# Altium PCB PCB1.PcbDoc (part 4 of 8)
Units mil, origin at the board's own origin, x right, y up, seen from the top; angles counter-clockwise.
Board outline 1968.5 x 1968.5 mil, 4 copper layers (Top Layer, Layer 1, Layer 2, Bottom Layer), stack 23.756 mil thick; 223 components, 143 nets, 652 pads, 329 vias.
Unrouted connection lines stored in the file: 15.
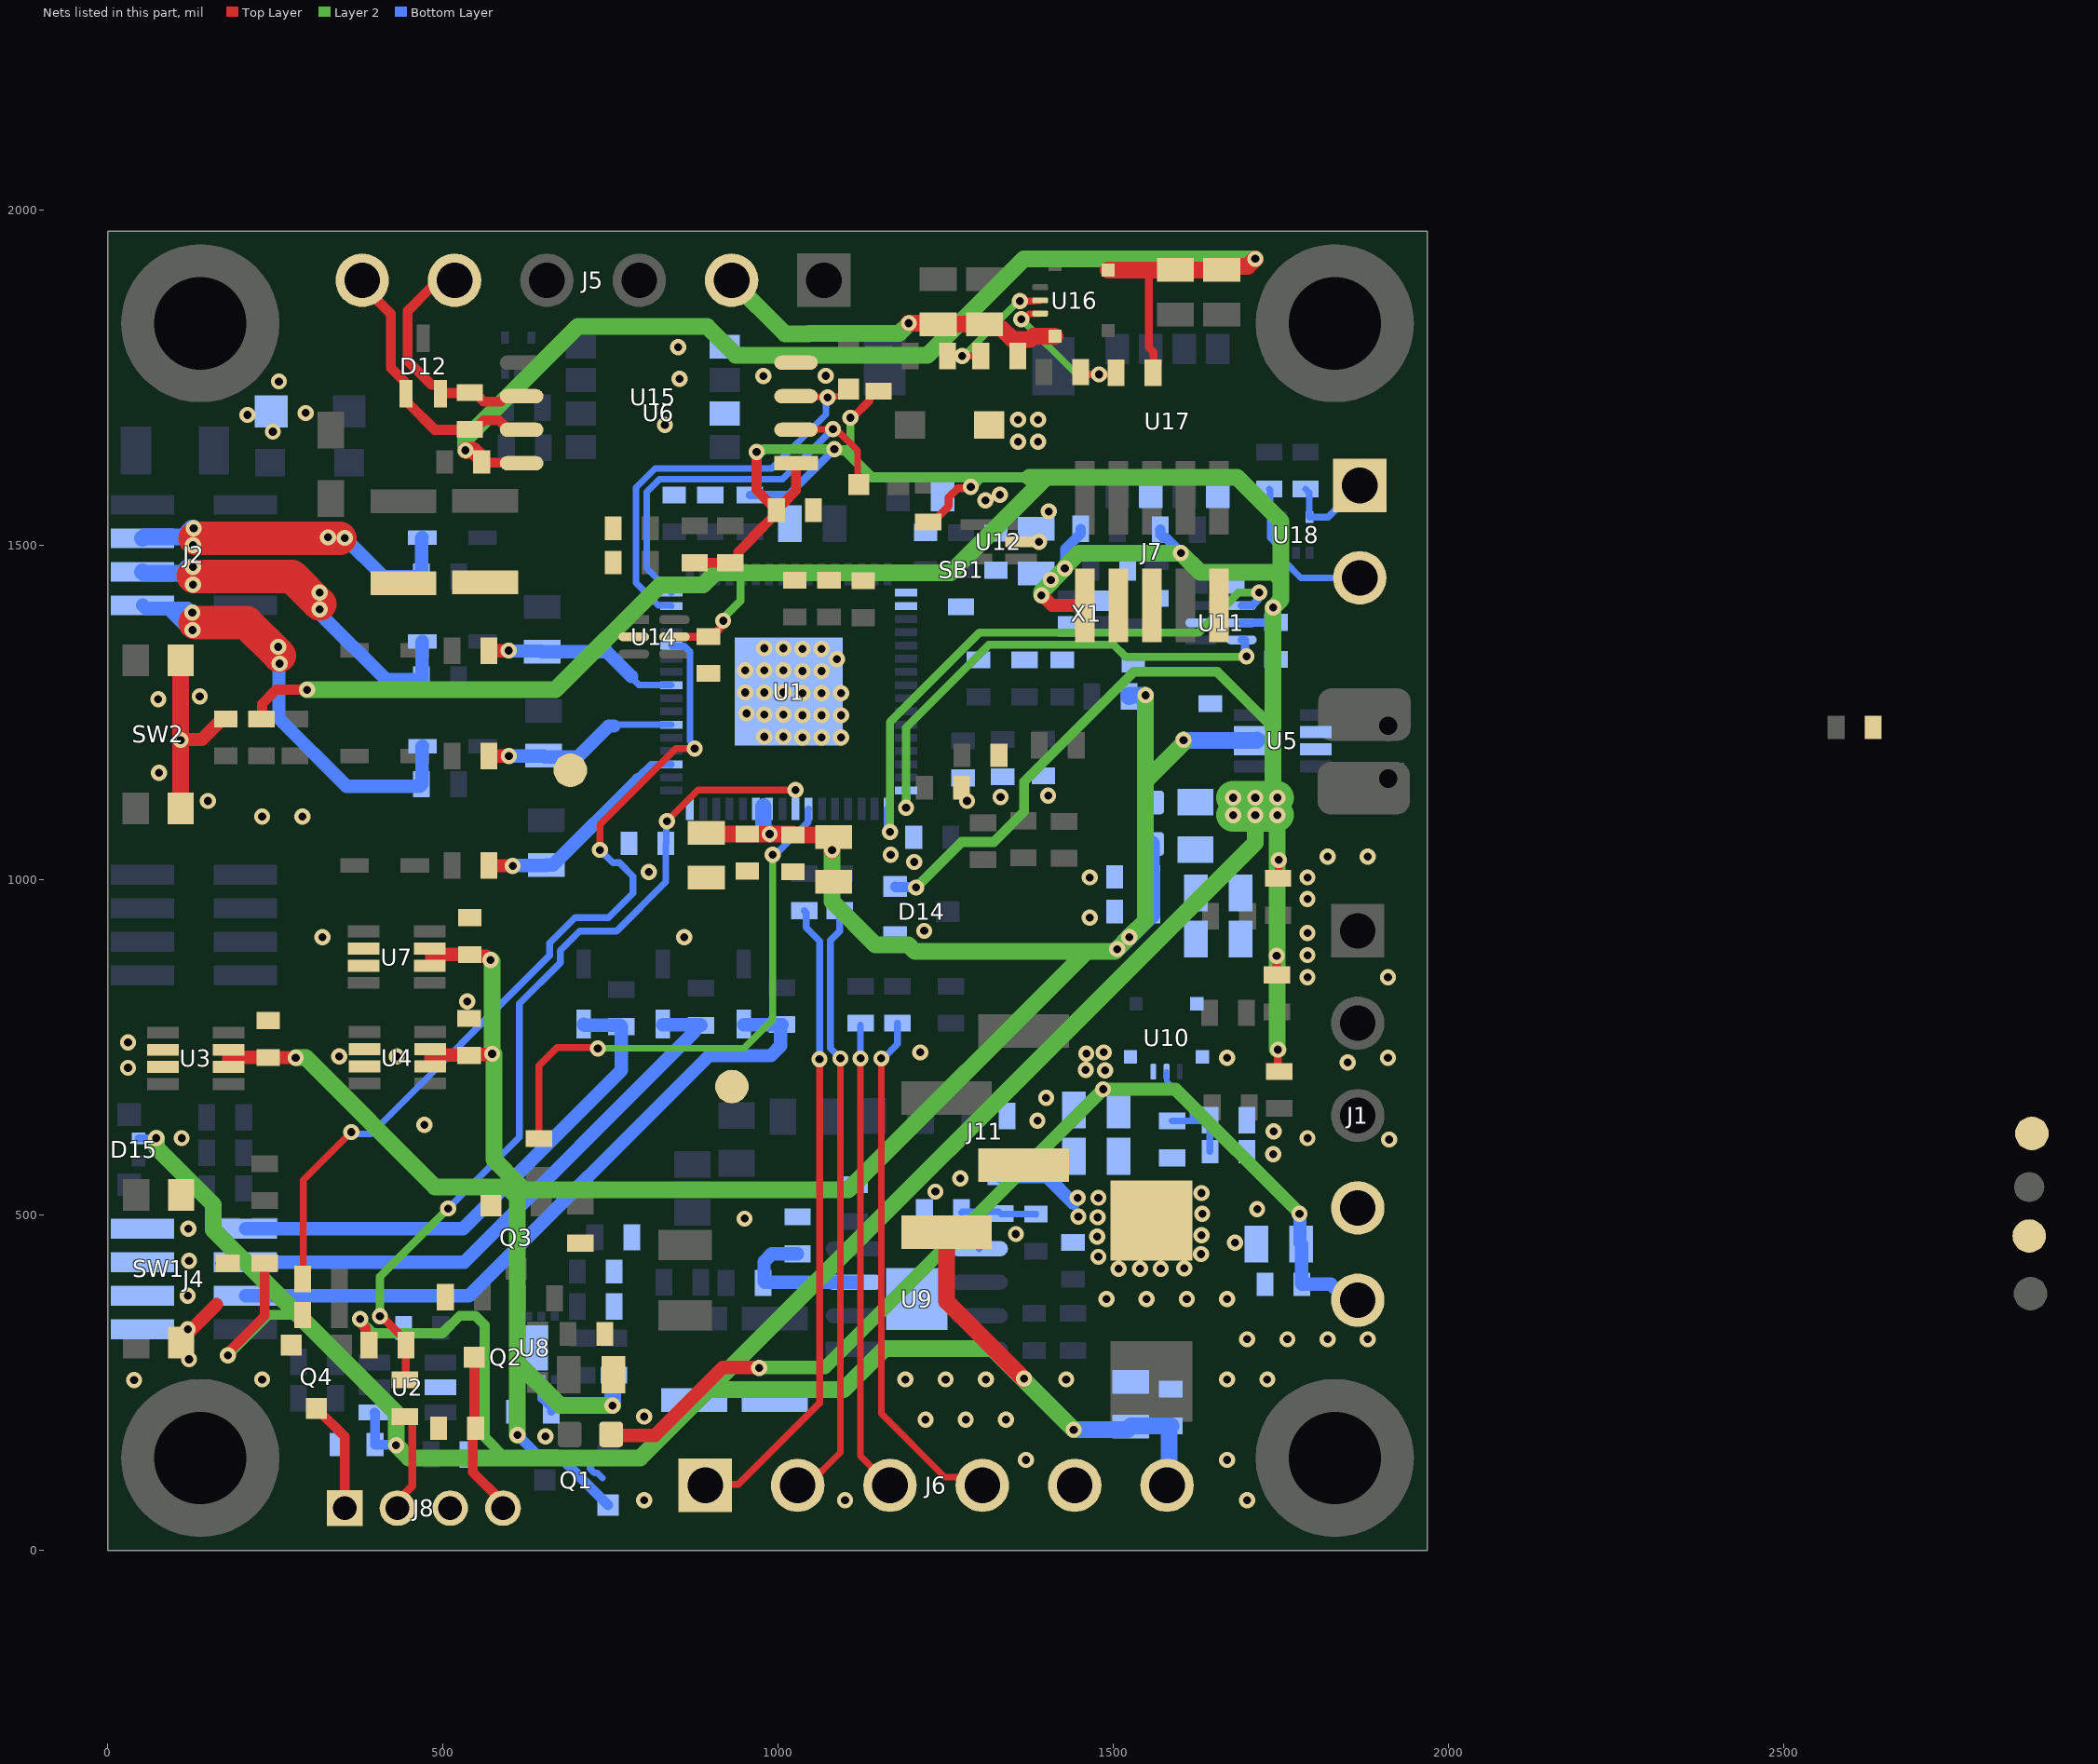
[diagram p4: the nets of this part, all layers, seen from the top]

## Part data (continued)
R21 R24: library part RS73F1JTTD2001B, "Res Thick Film 0603 2K Ohm 0.1% 0.2W(1/5W) ±25ppm/C Pad SMD T/R Automotive AEC-Q200", Arrow Part Number=SR0603FR-7T10KL, Case/Package=0603, Manufacturer="Yageo Group", Max Operating Temperature=155°C, Max Voltage Rating (DC)=100V, Min Operating Temperature=-55°C, Mouser Part Number=603-SR0603FR-7T10KL, Power Rating=250mW, Ratings=AEC-Q200, Supplier Part Number=YAG5823CT-ND, Temperature Coefficient=100ppm/°C, Tolerance=1%, Voltage Rating=75V, Working Voltage=150V, Arrow Price/Stock=https://www.arrow.com/en/products/sr0603fr-7t10kl/yageo, Category="Chip SMD Resistors", China RoHS=Non-Compliant, ComponentLink1Description=https://datasheet.octopart.com:443/SR0603FR-7T10KL-Yageo-datasheet-176402240.pdf?src-supplier=Farnell, ComponentLink1URL=https://datasheet.octopart.com:443/SR0603FR-7T10KL-Yageo-datasheet-176402240.pdf?src-supplier=Farnell, ComponentLink2Description=https://datasheet.octopart.com:443/SR0603FR-7T10KL-Yageo-datasheet-119732217.pdf?src-supplier=Upverter, ComponentLink2URL=https://datasheet.octopart.com:443/SR0603FR-7T10KL-Yageo-datasheet-119732217.pdf?src-supplier=Upverter, ComponentLink3Description=https://datasheet.octopart.com:443/SR0603FR-7T10KL-Yageo-Group-datasheet-184785656.pdf?src-supplier=Future+Electronics, ComponentLink3URL=https://datasheet.octopart.com:443/SR0603FR-7T10KL-Yageo-Group-datasheet-184785656.pdf?src-supplier=Future+Electronics, ComponentLink4Description=https://datasheet.octopart.com:443/SR0603FR-7T10KL-Yageo-datasheet-155675517.pdf?src-supplier=Future+Electronics, ComponentLink4URL=https://datasheet.octopart.com:443/SR0603FR-7T10KL-Yageo-datasheet-155675517.pdf?src-supplier=Future+Electronics, ComponentLink5Description=https://datasheet.octopart.com:443/SR0603FR-7T10KL-Yageo-datasheet-137701088.pdf?src-supplier=Future+Electronics, ComponentLink5URL=https://datasheet.octopart.com:443/SR0603FR-7T10KL-Yageo-datasheet-137701088.pdf?src-supplier=Future+Electronics, ComponentLink6Description=https://datasheet.octopart.com/SR0603FR-7T10KL-Yageo-datasheet-11047080.pdf, ComponentLink6URL=https://datasheet.octopart.com/SR0603FR-7T10KL-Yageo-datasheet-11047080.pdf, ComponentLink7Description=http://sigma.octopart.com:80/conflict_mineral_statement/Yageo-company-3.pdf?src-supplier=Compliance+Statements, ComponentLink7URL=http://sigma.octopart.com:80/conflict_mineral_statement/Yageo-company-3.pdf?src-supplier=Compliance+Statements, ComponentLink8Description=http://sigma.octopart.com:80/rohs_statement/Yageo-company-2.pdf?src-supplier=Compliance+Statements, ComponentLink8URL=http://sigma.octopart.com:80/rohs_statement/Yageo-company-2.pdf?src-supplier=Compliance+Statements, ComponentLink9Description=https://datasheet.octopart.com:443/SR0603FR-7T4R7L-Yageo-datasheet-176402240.pdf?src-supplier=Farnell, ComponentLink9URL=https://datasheet.octopart.com:443/SR0603FR-7T4R7L-Yageo-datasheet-176402240.pdf?src-supplier=Farnell, ComponentLink10Description=https://datasheet.octopart.com:443/SR0603FR-7T4R7L-Yageo-datasheet-119732217.pdf?src-supplier=Upverter, ComponentLink10URL=https://datasheet.octopart.com:443/SR0603FR-7T4R7L-Yageo-datasheet-119732217.pdf?src-supplier=Upverter, ComponentLink11Description=https://datasheet.octopart.com:443/SR0603FR-7T4R7L-Yageo-Group-datasheet-184785656.pdf?src-supplier=Future+Electronics, ComponentLink11URL=https://datasheet.octopart.com:443/SR0603FR-7T4R7L-Yageo-Group-datasheet-184785656.pdf?src-supplier=Future+Electronics, ComponentLink12Description=https://datasheet.octopart.com:443/SR0603FR-7T4R7L-Yageo-datasheet-155675517.pdf?src-supplier=Future+Electronics, ComponentLink12URL=https://datasheet.octopart.com:443/SR0603FR-7T4R7L-Yageo-datasheet-155675517.pdf?src-supplier=Future+Electronics, ComponentLink13Description=https://datasheet.octopart.com:443/SR0603FR-7T4R7L-Yageo-datasheet-137701088.pdf?src-supplier=Future+Electronics, ComponentLink13URL=https://datasheet.octopart.com:443/SR0603FR-7T4R7L-Yageo-datasheet-137701088.pdf?src-supplier=Future+Electronics, ComponentLink14Description=https://datasheet.octopart.com/SR0603FR-7T4R7L-Yageo-datasheet-11047080.pdf, ComponentLink14URL=https://datasheet.octopart.com/SR0603FR-7T4R7L-Yageo-datasheet-11047080.pdf, ComponentLink15Description=https://datasheet.octopart.com:443/SR0603FR-7T100KL-Yageo-datasheet-176402240.pdf?src-supplier=element14+APAC, ComponentLink15URL=https://datasheet.octopart.com:443/SR0603FR-7T100KL-Yageo-datasheet-176402240.pdf?src-supplier=element14+APAC, ComponentLink16Description=https://datasheet.octopart.com:443/SR0603FR-7T100KL-Yageo-datasheet-119732217.pdf?src-supplier=Upverter, ComponentLink16URL=https://datasheet.octopart.com:443/SR0603FR-7T100KL-Yageo-datasheet-119732217.pdf?src-supplier=Upverter, ComponentLink17Description=https://datasheet.octopart.com:443/SR0603FR-7T100KL-Yageo-Group-datasheet-184785656.pdf?src-supplier=Future+Electronics, ComponentLink17URL=https://datasheet.octopart.com:443/SR0603FR-7T100KL-Yageo-Group-datasheet-184785656.pdf?src-supplier=Future+Electronics, ComponentLink18Description=https://datasheet.octopart.com:443/SR0603FR-7T100KL-Yageo-datasheet-155675517.pdf?src-supplier=Future+Electronics, ComponentLink18URL=https://datasheet.octopart.com:443/SR0603FR-7T100KL-Yageo-datasheet-155675517.pdf?src-supplier=Future+Electronics, ComponentLink19Description=https://datasheet.octopart.com:443/SR0603FR-7T100KL-Yageo-datasheet-137701088.pdf?src-supplier=Future+Electronics, ComponentLink19URL=https://datasheet.octopart.com:443/SR0603FR-7T100KL-Yageo-datasheet-137701088.pdf?src-supplier=Future+Electronics, ComponentLink20Description=https://datasheet.octopart.com/SR0603FR-7T100KL-Yageo-datasheet-11047080.pdf, ComponentLink20URL=https://datasheet.octopart.com/SR0603FR-7T100KL-Yageo-datasheet-11047080.pdf, ComponentLink21Description=https://datasheet.octopart.com:443/RS73F1JTTD2001B-KOA-Speer-datasheet-182143723.pdf?src-supplier=IHS, ComponentLink21URL=https://datasheet.octopart.com:443/RS73F1JTTD2001B-KOA-Speer-datasheet-182143723.pdf?src-supplier=IHS, ComponentLink22Description=https://datasheet.octopart.com:443/RS73F1JTTD2001B-KOA-Speer-datasheet-141350738.pdf?src-supplier=KOA+Speer+SCT, ComponentLink22URL=https://datasheet.octopart.com:443/RS73F1JTTD2001B-KOA-Speer-datasheet-141350738.pdf?src-supplier=KOA+Speer+SCT, ComponentLink23Description=https://sigma.octopart.com:443/141350679/technical_drawing/KOA-Speer-RS73F1JTTD2001B.pdf?src-supplier=KOA+Speer+SCT, ComponentLink23URL=https://sigma.octopart.com:443/141350679/technical_drawing/KOA-Speer-RS73F1JTTD2001B.pdf?src-supplier=KOA+Speer+SCT, ComponentLink24Description=http://sigma.octopart.com:80/rohs_statement/KOA-Speer-company-17.pdf?src-supplier=Compliance+Statements, ComponentLink24URL=http://sigma.octopart.com:80/rohs_statement/KOA-Speer-company-17.pdf?src-supplier=Compliance+Statements, Composition="Thick Film", Country of Origin="Mainland China, Taiwan", Datasheet Link=https://mouser.componentsearchengine.com/Datasheets/1/SR0603FR-7T10KL.pdf, Export Control Classification Number (ECCN) Code=EAR99, Harmonized Tariff Schedule (HTS) Code=8533.21.00.30, Height=0.55mm, Introduction Date=2017-10-02, Length=1.6mm, Lifecycle Status=Production, Manufacturer Part Number=SR0603FR-7T10KL, Manufacturer_Name="Yageo Group", Manufacturer_Part_Number=SR0603FR-7T10KL, Mounting Technology="Surface Mount", Mouser Price/Stock=https://www.mouser.co.uk/ProductDetail/YAGEO/SR0603FR-7T10KL?qs=pfd5qewlna6IurLw3u3uRA%3D%3D, Number of Terminals=2, Packaging="Tape & Reel", Pricing="1=0,67, 10=0,399, 25=0,3376, 50=0,3022, 100=0,2744, 250=0,24612, 500=0,22976, 1000=0,21675 (USD)", REACH SVHC=Yes, RoHS=Compliant, Schedule B="8533210045, 8533210045|8533210045|8533210045|8533210045|8533210045", Stock=5000, Supplier=DigiKey, Width=800µm
R22 R31 R32: library part RK73H1JTTD1200F, "Res Thick Film 0603 120 Ohm 1% 0.125W(1/8W) ±100ppm/C Pad SMD T/R Automotive AEC-Q200", Arrow Part Number=SR0603FR-7T10KL, Case Code (Imperial)=0603, Case Code (Metric)=1608, Manufacturer="Yageo Group", Max Operating Temperature=155°C, Max Power Dissipation=125mW, Max Voltage Rating (DC)=150V, Min Operating Temperature=-55°C, Mouser Part Number=603-SR0603FR-7T10KL, Power Rating=250mW, Ratings=AEC-Q200, Supplier Part Number=YAG5823CT-ND, Temperature Coefficient=100ppm/°C, Tolerance=1%, Voltage Rating=75V, Voltage Rating (DC)=50V, Arrow Price/Stock=https://www.arrow.com/en/products/sr0603fr-7t10kl/yageo, Case/Package=0603, Category="Chip SMD Resistors", China RoHS=Non-Compliant, ComponentLink1Description=https://datasheet.octopart.com:443/SR0603FR-7T10KL-Yageo-datasheet-176402240.pdf?src-supplier=Farnell, ComponentLink1URL=https://datasheet.octopart.com:443/SR0603FR-7T10KL-Yageo-datasheet-176402240.pdf?src-supplier=Farnell, ComponentLink2Description=https://datasheet.octopart.com:443/SR0603FR-7T10KL-Yageo-datasheet-119732217.pdf?src-supplier=Upverter, ComponentLink2URL=https://datasheet.octopart.com:443/SR0603FR-7T10KL-Yageo-datasheet-119732217.pdf?src-supplier=Upverter, ComponentLink3Description=https://datasheet.octopart.com:443/SR0603FR-7T10KL-Yageo-Group-datasheet-184785656.pdf?src-supplier=Future+Electronics, ComponentLink3URL=https://datasheet.octopart.com:443/SR0603FR-7T10KL-Yageo-Group-datasheet-184785656.pdf?src-supplier=Future+Electronics, ComponentLink4Description=https://datasheet.octopart.com:443/SR0603FR-7T10KL-Yageo-datasheet-155675517.pdf?src-supplier=Future+Electronics, ComponentLink4URL=https://datasheet.octopart.com:443/SR0603FR-7T10KL-Yageo-datasheet-155675517.pdf?src-supplier=Future+Electronics, ComponentLink5Description=https://datasheet.octopart.com:443/SR0603FR-7T10KL-Yageo-datasheet-137701088.pdf?src-supplier=Future+Electronics, ComponentLink5URL=https://datasheet.octopart.com:443/SR0603FR-7T10KL-Yageo-datasheet-137701088.pdf?src-supplier=Future+Electronics, ComponentLink6Description=https://datasheet.octopart.com/SR0603FR-7T10KL-Yageo-datasheet-11047080.pdf, ComponentLink6URL=https://datasheet.octopart.com/SR0603FR-7T10KL-Yageo-datasheet-11047080.pdf, ComponentLink7Description=http://sigma.octopart.com:80/conflict_mineral_statement/Yageo-company-3.pdf?src-supplier=Compliance+Statements, ComponentLink7URL=http://sigma.octopart.com:80/conflict_mineral_statement/Yageo-company-3.pdf?src-supplier=Compliance+Statements, ComponentLink8Description=http://sigma.octopart.com:80/rohs_statement/Yageo-company-2.pdf?src-supplier=Compliance+Statements, ComponentLink8URL=http://sigma.octopart.com:80/rohs_statement/Yageo-company-2.pdf?src-supplier=Compliance+Statements, ComponentLink9Description=https://datasheet.octopart.com:443/SR0603FR-7T4R7L-Yageo-datasheet-176402240.pdf?src-supplier=Farnell, ComponentLink9URL=https://datasheet.octopart.com:443/SR0603FR-7T4R7L-Yageo-datasheet-176402240.pdf?src-supplier=Farnell, ComponentLink10Description=https://datasheet.octopart.com:443/SR0603FR-7T4R7L-Yageo-datasheet-119732217.pdf?src-supplier=Upverter, ComponentLink10URL=https://datasheet.octopart.com:443/SR0603FR-7T4R7L-Yageo-datasheet-119732217.pdf?src-supplier=Upverter, ComponentLink11Description=https://datasheet.octopart.com:443/SR0603FR-7T4R7L-Yageo-Group-datasheet-184785656.pdf?src-supplier=Future+Electronics, ComponentLink11URL=https://datasheet.octopart.com:443/SR0603FR-7T4R7L-Yageo-Group-datasheet-184785656.pdf?src-supplier=Future+Electronics, ComponentLink12Description=https://datasheet.octopart.com:443/SR0603FR-7T4R7L-Yageo-datasheet-155675517.pdf?src-supplier=Future+Electronics, ComponentLink12URL=https://datasheet.octopart.com:443/SR0603FR-7T4R7L-Yageo-datasheet-155675517.pdf?src-supplier=Future+Electronics, ComponentLink13Description=https://datasheet.octopart.com:443/SR0603FR-7T4R7L-Yageo-datasheet-137701088.pdf?src-supplier=Future+Electronics, ComponentLink13URL=https://datasheet.octopart.com:443/SR0603FR-7T4R7L-Yageo-datasheet-137701088.pdf?src-supplier=Future+Electronics, ComponentLink14Description=https://datasheet.octopart.com/SR0603FR-7T4R7L-Yageo-datasheet-11047080.pdf, ComponentLink14URL=https://datasheet.octopart.com/SR0603FR-7T4R7L-Yageo-datasheet-11047080.pdf, ComponentLink15Description=https://datasheet.octopart.com:443/SG73G1JTTD5102C-KOA-Speer-datasheet-181956059.pdf?src-supplier=IHS, ComponentLink15URL=https://datasheet.octopart.com:443/SG73G1JTTD5102C-KOA-Speer-datasheet-181956059.pdf?src-supplier=IHS, ComponentLink16Description=https://sigma.octopart.com:443/141350679/technical_drawing/KOA-Speer-SG73G1JTTD5102C.pdf?src-supplier=KOA+Speer+SCT, ComponentLink16URL=https://sigma.octopart.com:443/141350679/technical_drawing/KOA-Speer-SG73G1JTTD5102C.pdf?src-supplier=KOA+Speer+SCT, ComponentLink17Description=https://datasheet.octopart.com:443/SG73G1JTTD5102C-KOA-Speer-datasheet-141350755.pdf?src-supplier=KOA+Speer+SCT, ComponentLink17URL=https://datasheet.octopart.com:443/SG73G1JTTD5102C-KOA-Speer-datasheet-141350755.pdf?src-supplier=KOA+Speer+SCT, ComponentLink18Description=http://sigma.octopart.com:80/rohs_statement/KOA-Speer-company-17.pdf?src-supplier=Compliance+Statements, ComponentLink18URL=http://sigma.octopart.com:80/rohs_statement/KOA-Speer-company-17.pdf?src-supplier=Compliance+Statements, ComponentLink19Description=https://datasheet.octopart.com:443/ESR03EZPD5102-ROHM-datasheet-182147624.pdf?src-supplier=IHS, ComponentLink19URL=https://datasheet.octopart.com:443/ESR03EZPD5102-ROHM-datasheet-182147624.pdf?src-supplier=IHS, ComponentLink20Description=https://datasheet.octopart.com:443/RK73H1JTTD68R0F-KOA-Speer-datasheet-181956035.pdf?src-supplier=IHS, ComponentLink20URL=https://datasheet.octopart.com:443/RK73H1JTTD68R0F-KOA-Speer-datasheet-181956035.pdf?src-supplier=IHS, ComponentLink21Description=https://datasheet.octopart.com:443/RK73H1JTTD68R0F-KOA-Speer-datasheet-11590619.pdf?src-supplier=Upverter, ComponentLink21URL=https://datasheet.octopart.com:443/RK73H1JTTD68R0F-KOA-Speer-datasheet-11590619.pdf?src-supplier=Upverter, ComponentLink22Description=https://datasheet.octopart.com:443/RK73H1JTTD68R0F-KOA-Speer-datasheet-149653815.pdf?src-supplier=Newark, ComponentLink22URL=https://datasheet.octopart.com:443/RK73H1JTTD68R0F-KOA-Speer-datasheet-149653815.pdf?src-supplier=Newark, ComponentLink23Description=https://datasheet.octopart.com:443/RK73H1JTTD68R0F-KOA-Speer-datasheet-10854116.pdf?src-supplier=element14+APAC, ComponentLink23URL=https://datasheet.octopart.com:443/RK73H1JTTD68R0F-KOA-Speer-datasheet-10854116.pdf?src-supplier=element14+APAC, ComponentLink24Description=https://datasheet.octopart.com:443/RNCP0603FTD10K0-Stackpole-Electronics-datasheet-182148179.pdf?src-supplier=IHS, ComponentLink24URL=https://datasheet.octopart.com:443/RNCP0603FTD10K0-Stackpole-Electronics-datasheet-182148179.pdf?src-supplier=IHS, ComponentLink25Description=https://datasheet.octopart.com:443/RNCP0603FTD10K0-Stackpole-Electronics-datasheet-141193801.pdf?src-supplier=Upverter, ComponentLink25URL=https://datasheet.octopart.com:443/RNCP0603FTD10K0-Stackpole-Electronics-datasheet-141193801.pdf?src-supplier=Upverter, ComponentLink26Description=https://datasheet.octopart.com:443/RNCP0603FTD10K0-Stackpole-Electronics-datasheet-38896780.pdf?src-supplier=Upverter, ComponentLink26URL=https://datasheet.octopart.com:443/RNCP0603FTD10K0-Stackpole-Electronics-datasheet-38896780.pdf?src-supplier=Upverter, ComponentLink27Description=https://datasheet.octopart.com:443/RNCP0603FTD10K0-Stackpole-Electronics-datasheet-149178200.pdf?src-supplier=Upverter, ComponentLink27URL=https://datasheet.octopart.com:443/RNCP0603FTD10K0-Stackpole-Electronics-datasheet-149178200.pdf?src-supplier=Upverter, ComponentLink28Description=https://datasheet.octopart.com:443/RNCP0603FTD10K0-Stackpole-Electronics-datasheet-33021030.pdf?src-supplier=Future+Electronics, ComponentLink28URL=https://datasheet.octopart.com:443/RNCP0603FTD10K0-Stackpole-Electronics-datasheet-33021030.pdf?src-supplier=Future+Electronics, ComponentLink29Description=http://sigma.octopart.com:80/15942470/materials_sheet/Stackpole-Electronics-RNCP0603FTD10K0.pdf?src-supplier=Compliance+Statements, ComponentLink29URL=http://sigma.octopart.com:80/15942470/materials_sheet/Stackpole-Electronics-RNCP0603FTD10K0.pdf?src-supplier=Compliance+Statements, ComponentLink30Description=http://sigma.octopart.com:80/141158212/rohs_statement/Stackpole-Electronics-RNCP0603FTD10K0.pdf?src-supplier=Compliance+Statements, ComponentLink30URL=http://sigma.octopart.com:80/141158212/rohs_statement/Stackpole-Electronics-RNCP0603FTD10K0.pdf?src-supplier=Compliance+Statements, ComponentLink31Description=http://sigma.octopart.com:80/141158211/reach_statement/Stackpole-Electronics-RNCP0603FTD10K0.pdf?src-supplier=Compliance+Statements, ComponentLink31URL=http://sigma.octopart.com:80/141158211/reach_statement/Stackpole-Electronics-RNCP0603FTD10K0.pdf?src-supplier=Compliance+Statements, ComponentLink32Description=https://datasheet.octopart.com:443/RK73H1JTTD1200F-KOA-Speer-datasheet-181956035.pdf?src-supplier=IHS, ComponentLink32URL=https://datasheet.octopart.com:443/RK73H1JTTD1200F-KOA-Speer-datasheet-181956035.pdf?src-supplier=IHS, ComponentLink33Description=https://datasheet.octopart.com:443/RK73H1JTTD1200F-KOA-Speer-datasheet-11590619.pdf?src-supplier=Upverter, ComponentLink33URL=https://datasheet.octopart.com:443/RK73H1JTTD1200F-KOA-Speer-datasheet-11590619.pdf?src-supplier=Upverter, ComponentLink34Description=https://datasheet.octopart.com:443/RK73H1JTTD1200F-KOA-Speer-datasheet-149653815.pdf?src-supplier=Farnell, ComponentLink34URL=https://datasheet.octopart.com:443/RK73H1JTTD1200F-KOA-Speer-datasheet-149653815.pdf?src-supplier=Farnell, ComponentLink35Description=https://datasheet.octopart.com:443/RK73H1JTTD1200F-KOA-Speer-datasheet-188906116.pdf?src-supplier=TME, ComponentLink35URL=https://datasheet.octopart.com:443/RK73H1JTTD1200F-KOA-Speer-datasheet-188906116.pdf?src-supplier=TME, ComponentLink36Description=https://datasheet.octopart.com/RK73H-%7C-Flat-Chip-Resistors-%28Precision-Grade%29-KOA-Speer-datasheet-family-85.pdf, ComponentLink36URL=https://datasheet.octopart.com/RK73H-%7C-Flat-Chip-Resistors-%28Precision-Grade%29-KOA-Speer-datasheet-family-85.pdf, ComponentLink37Description=https://datasheet.octopart.com:443/RK73H1JTTD1200F-KOA-Speer-datasheet-10854116.pdf?src-supplier=element14+APAC, ComponentLink37URL=https://datasheet.octopart.com:443/RK73H1JTTD1200F-KOA-Speer-datasheet-10854116.pdf?src-supplier=element14+APAC, ComponentLink38Description=http://sigma.octopart.com:80/rohs_certificate/RK73H-%7C-Flat-Chip-Resistors-%28Precision-Grade%29-KOA-Speer-family-91.pdf?src-supplier=Compliance+Statements, ComponentLink38URL=http://sigma.octopart.com:80/rohs_certificate/RK73H-%7C-Flat-Chip-Resistors-%28Precision-Grade%29-KOA-Speer-family-91.pdf?src-supplier=Compliance+Statements, Composition="Thick Film", Contact Plating=Tin, Country of Origin="Mainland China, Taiwan", Datasheet Link=https://mouser.componentsearchengine.com/Datasheets/1/SR0603FR-7T10KL.pdf, Depth=800µm, Export Control Classification Number (ECCN) Code=EAR99, Features="Anti-Sulfur, Moisture Resistant", Harmonized Tariff Schedule (HTS) Code=8533.21.00.30, Height=0.55mm, Introduction Date=2017-10-02, Lead Free="Lead Free", Length=1.6mm, Lifecycle Status=Production, Manufacturer Part Number=SR0603FR-7T10KL, Manufacturer_Name="Yageo Group", Manufacturer_Part_Number=SR0603FR-7T10KL, Military Standard=Not, Mounting Technology="Surface Mount", Mouser Price/Stock=https://www.mouser.co.uk/ProductDetail/YAGEO/SR0603FR-7T10KL?qs=pfd5qewlna6IurLw3u3uRA%3D%3D, Number of Terminals=2, Number of Terminations=2, Packaging="Tape & Reel", Pins=2, Pricing="1=0,67, 10=0,399, 25=0,3376, 50=0,3022, 100=0,2744, 250=0,24612, 500=0,22976, 1000=0,21675 (USD)", Radiation Hardening=No, REACH SVHC=Yes, RoHS=Compliant, Schedule B="8533210045, 8533210045|8533210045, 8533210045|8533210045|8533210045, 8533210045|8533210045|8533210045|8533210045", Stock=5000, Supplier=DigiKey, Termination=SMD/SMT, Width=800µm, Working Voltage=150V
R28 R29 R30 R55 R56 R57 R60 R62 R63 R64 R65 R66 R67 R68 R69 R70 R78: library part AC0603FR-7W2KL, "Fixed Resistor, Metal Glaze/Thick Film, 0.2W, 2000ohm, 75V, 1% +/-Tol, Surface Mount, 0603", Arrow Part Number=SR0603FR-7T10KL, Case/Package=0603, Manufacturer="Yageo Group", Max Operating Temperature=155°C, Max Voltage Rating (DC)=100V, Min Operating Temperature=-55°C, Mouser Part Number=603-SR0603FR-7T10KL, Power Rating=250mW, Ratings=AEC-Q200, Supplier Part Number=YAG5823CT-ND, Temperature Coefficient=100ppm/°C, Tolerance=1%, Voltage Rating=75V, Working Voltage=150V, Arrow Price/Stock=https://www.arrow.com/en/products/sr0603fr-7t10kl/yageo, Category="Chip SMD Resistors", China RoHS=Non-Compliant, ClassName=gate_driver, ComponentLink1Description=https://datasheet.octopart.com:443/SR0603FR-7T10KL-Yageo-datasheet-176402240.pdf?src-supplier=Farnell, ComponentLink1URL=https://datasheet.octopart.com:443/SR0603FR-7T10KL-Yageo-datasheet-176402240.pdf?src-supplier=Farnell, ComponentLink2Description=https://datasheet.octopart.com:443/SR0603FR-7T10KL-Yageo-datasheet-119732217.pdf?src-supplier=Upverter, ComponentLink2URL=https://datasheet.octopart.com:443/SR0603FR-7T10KL-Yageo-datasheet-119732217.pdf?src-supplier=Upverter, ComponentLink3Description=https://datasheet.octopart.com:443/SR0603FR-7T10KL-Yageo-Group-datasheet-184785656.pdf?src-supplier=Future+Electronics, ComponentLink3URL=https://datasheet.octopart.com:443/SR0603FR-7T10KL-Yageo-Group-datasheet-184785656.pdf?src-supplier=Future+Electronics, ComponentLink4Description=https://datasheet.octopart.com:443/SR0603FR-7T10KL-Yageo-datasheet-155675517.pdf?src-supplier=Future+Electronics, ComponentLink4URL=https://datasheet.octopart.com:443/SR0603FR-7T10KL-Yageo-datasheet-155675517.pdf?src-supplier=Future+Electronics, ComponentLink5Description=https://datasheet.octopart.com:443/SR0603FR-7T10KL-Yageo-datasheet-137701088.pdf?src-supplier=Future+Electronics, ComponentLink5URL=https://datasheet.octopart.com:443/SR0603FR-7T10KL-Yageo-datasheet-137701088.pdf?src-supplier=Future+Electronics, ComponentLink6Description=https://datasheet.octopart.com/SR0603FR-7T10KL-Yageo-datasheet-11047080.pdf, ComponentLink6URL=https://datasheet.octopart.com/SR0603FR-7T10KL-Yageo-datasheet-11047080.pdf, ComponentLink7Description=http://sigma.octopart.com:80/conflict_mineral_statement/Yageo-company-3.pdf?src-supplier=Compliance+Statements, ComponentLink7URL=http://sigma.octopart.com:80/conflict_mineral_statement/Yageo-company-3.pdf?src-supplier=Compliance+Statements, ComponentLink8Description=http://sigma.octopart.com:80/rohs_statement/Yageo-company-2.pdf?src-supplier=Compliance+Statements, ComponentLink8URL=http://sigma.octopart.com:80/rohs_statement/Yageo-company-2.pdf?src-supplier=Compliance+Statements, ComponentLink9Description=https://datasheet.octopart.com:443/SR0603FR-7T4R7L-Yageo-datasheet-176402240.pdf?src-supplier=Farnell, ComponentLink9URL=https://datasheet.octopart.com:443/SR0603FR-7T4R7L-Yageo-datasheet-176402240.pdf?src-supplier=Farnell, ComponentLink10Description=https://datasheet.octopart.com:443/SR0603FR-7T4R7L-Yageo-datasheet-119732217.pdf?src-supplier=Upverter, ComponentLink10URL=https://datasheet.octopart.com:443/SR0603FR-7T4R7L-Yageo-datasheet-119732217.pdf?src-supplier=Upverter, ComponentLink11Description=https://datasheet.octopart.com:443/SR0603FR-7T4R7L-Yageo-Group-datasheet-184785656.pdf?src-supplier=Future+Electronics, ComponentLink11URL=https://datasheet.octopart.com:443/SR0603FR-7T4R7L-Yageo-Group-datasheet-184785656.pdf?src-supplier=Future+Electronics, ComponentLink12Description=https://datasheet.octopart.com:443/SR0603FR-7T4R7L-Yageo-datasheet-155675517.pdf?src-supplier=Future+Electronics, ComponentLink12URL=https://datasheet.octopart.com:443/SR0603FR-7T4R7L-Yageo-datasheet-155675517.pdf?src-supplier=Future+Electronics, ComponentLink13Description=https://datasheet.octopart.com:443/SR0603FR-7T4R7L-Yageo-datasheet-137701088.pdf?src-supplier=Future+Electronics, ComponentLink13URL=https://datasheet.octopart.com:443/SR0603FR-7T4R7L-Yageo-datasheet-137701088.pdf?src-supplier=Future+Electronics, ComponentLink14Description=https://datasheet.octopart.com/SR0603FR-7T4R7L-Yageo-datasheet-11047080.pdf, ComponentLink14URL=https://datasheet.octopart.com/SR0603FR-7T4R7L-Yageo-datasheet-11047080.pdf, ComponentLink15Description=https://datasheet.octopart.com:443/SR0603FR-7T100KL-Yageo-datasheet-176402240.pdf?src-supplier=element14+APAC, ComponentLink15URL=https://datasheet.octopart.com:443/SR0603FR-7T100KL-Yageo-datasheet-176402240.pdf?src-supplier=element14+APAC, ComponentLink16Description=https://datasheet.octopart.com:443/SR0603FR-7T100KL-Yageo-datasheet-119732217.pdf?src-supplier=Upverter, ComponentLink16URL=https://datasheet.octopart.com:443/SR0603FR-7T100KL-Yageo-datasheet-119732217.pdf?src-supplier=Upverter, ComponentLink17Description=https://datasheet.octopart.com:443/SR0603FR-7T100KL-Yageo-Group-datasheet-184785656.pdf?src-supplier=Future+Electronics, ComponentLink17URL=https://datasheet.octopart.com:443/SR0603FR-7T100KL-Yageo-Group-datasheet-184785656.pdf?src-supplier=Future+Electronics, ComponentLink18Description=https://datasheet.octopart.com:443/SR0603FR-7T100KL-Yageo-datasheet-155675517.pdf?src-supplier=Future+Electronics, ComponentLink18URL=https://datasheet.octopart.com:443/SR0603FR-7T100KL-Yageo-datasheet-155675517.pdf?src-supplier=Future+Electronics, ComponentLink19Description=https://datasheet.octopart.com:443/SR0603FR-7T100KL-Yageo-datasheet-137701088.pdf?src-supplier=Future+Electronics, ComponentLink19URL=https://datasheet.octopart.com:443/SR0603FR-7T100KL-Yageo-datasheet-137701088.pdf?src-supplier=Future+Electronics, ComponentLink20Description=https://datasheet.octopart.com/SR0603FR-7T100KL-Yageo-datasheet-11047080.pdf, ComponentLink20URL=https://datasheet.octopart.com/SR0603FR-7T100KL-Yageo-datasheet-11047080.pdf, ComponentLink21Description=https://datasheet.octopart.com:443/RS73F1JTTD2001B-KOA-Speer-datasheet-182143723.pdf?src-supplier=IHS, ComponentLink21URL=https://datasheet.octopart.com:443/RS73F1JTTD2001B-KOA-Speer-datasheet-182143723.pdf?src-supplier=IHS, ComponentLink22Description=https://datasheet.octopart.com:443/RS73F1JTTD2001B-KOA-Speer-datasheet-141350738.pdf?src-supplier=KOA+Speer+SCT, ComponentLink22URL=https://datasheet.octopart.com:443/RS73F1JTTD2001B-KOA-Speer-datasheet-141350738.pdf?src-supplier=KOA+Speer+SCT, ComponentLink23Description=https://sigma.octopart.com:443/141350679/technical_drawing/KOA-Speer-RS73F1JTTD2001B.pdf?src-supplier=KOA+Speer+SCT, ComponentLink23URL=https://sigma.octopart.com:443/141350679/technical_drawing/KOA-Speer-RS73F1JTTD2001B.pdf?src-supplier=KOA+Speer+SCT, ComponentLink24Description=http://sigma.octopart.com:80/rohs_statement/KOA-Speer-company-17.pdf?src-supplier=Compliance+Statements, ComponentLink24URL=http://sigma.octopart.com:80/rohs_statement/KOA-Speer-company-17.pdf?src-supplier=Compliance+Statements, ComponentLink25Description=https://datasheet.octopart.com:443/AC0603FR-7W2KL-Yageo-datasheet-182189377.pdf?src-supplier=IHS, ComponentLink25URL=https://datasheet.octopart.com:443/AC0603FR-7W2KL-Yageo-datasheet-182189377.pdf?src-supplier=IHS, ComponentLink26Description=https://datasheet.octopart.com:443/AC0603FR-7W2KL-Yageo-datasheet-86786639.pdf?src-supplier=Upverter, ComponentLink26URL=https://datasheet.octopart.com:443/AC0603FR-7W2KL-Yageo-datasheet-86786639.pdf?src-supplier=Upverter, ComponentLink27Description=https://datasheet.octopart.com/AC0603FR-7W2KL-Yageo-datasheet-12512238.pdf, ComponentLink27URL=https://datasheet.octopart.com/AC0603FR-7W2KL-Yageo-datasheet-12512238.pdf, Composition="Thick Film", Country of Origin="Mainland China, Taiwan", Datasheet Link=https://mouser.componentsearchengine.com/Datasheets/1/SR0603FR-7T10KL.pdf, Export Control Classification Number (ECCN) Code=EAR99, Harmonized Tariff Schedule (HTS) Code=8533.21.00.30, Height=0.55mm, Introduction Date=2017-10-02, Length=1.6mm, Lifecycle Status=Production, Manufacturer Part Number=SR0603FR-7T10KL, Manufacturer_Name="Yageo Group", Manufacturer_Part_Number=SR0603FR-7T10KL, Mounting Technology="Surface Mount", Mouser Price/Stock=https://www.mouser.co.uk/ProductDetail/YAGEO/SR0603FR-7T10KL?qs=pfd5qewlna6IurLw3u3uRA%3D%3D, Number of Terminals=2, Packaging="Tape & Reel", Pricing="1=0,67, 10=0,399, 25=0,3376, 50=0,3022, 100=0,2744, 250=0,24612, 500=0,22976, 1000=0,21675 (USD)", REACH SVHC=Yes, RoHS=Compliant, Schedule B="8533210045, 8533210045|8533210045|8533210045|8533210045|8533210045", Stock=5000, Supplier=DigiKey, Width=800µm
R33 R34 R58 R59 R71: library part RQ73C2A75KBTD, "Fixed Resistor, Thin Film, 0.2W, 75000ohm, 100V, 0.1% +/-Tol, 10ppm/Cel, Surface Mount, 0805", Case/Package=0805, Manufacturer=Yageo, Manufacturer Lifecycle Status=ACTIVE, Manufacturer Part Number=SR0805FR-7W4R7L, Max Operating Temperature=155°C, Min Operating Temperature=-55°C, Operating Supply Voltage=100V, Package=SR0805, Power Rating=0.25W, Ratings=AEC-Q200, Resistance=4.7Ω, Temperature="-55°C to +155°C", Temperature Coefficient=10ppm/°C, Temperature Range High=+155°C, Tolerance=0.01, Voltage Rating=150V, Automotive=Yes, Automotive Grade="Grade 0", Category=Res, China RoHS=Compliant, ComponentLink1Description=https://datasheet.octopart.com:443/RQ73C2A75KBTD-TE-Connectivity-datasheet-179163842.pdf?src-supplier=IHS, ComponentLink1URL=https://datasheet.octopart.com:443/RQ73C2A75KBTD-TE-Connectivity-datasheet-179163842.pdf?src-supplier=IHS, ComponentLink2Description=Datasheet, ComponentLink2URL=http://www.yageo.com/documents/recent/PYu-SR_D_F%20tol_RoHS_L_3.pdf, ComponentLink3Description=https://datasheet.octopart.com:443/RQ73C2A75KBTD-TE-Connectivity-datasheet-141404639.pdf?src-supplier=Upverter, ComponentLink3URL=https://datasheet.octopart.com:443/RQ73C2A75KBTD-TE-Connectivity-datasheet-141404639.pdf?src-supplier=Upverter, ComponentLink4Description=https://datasheet.octopart.com:443/RQ73C2A75KBTD-TE-Connectivity-datasheet-129104565.pdf?src-supplier=Electro+Sonic, ComponentLink4URL=https://datasheet.octopart.com:443/RQ73C2A75KBTD-TE-Connectivity-datasheet-129104565.pdf?src-supplier=Electro+Sonic, ComponentLink5Description=https://sigma.octopart.com:443/129121914/technical_drawing/TE-Connectivity-RQ73C2A75KBTD.pdf?src-supplier=TE+Connectivity, ComponentLink5URL=https://sigma.octopart.com:443/129121914/technical_drawing/TE-Connectivity-RQ73C2A75KBTD.pdf?src-supplier=TE+Connectivity, ComponentLink6Description=https://datasheet.octopart.com:443/7-2176381-6-TE-Connectivity-datasheet-181572785.pdf?src-supplier=Sager+Electronics, ComponentLink6URL=https://datasheet.octopart.com:443/7-2176381-6-TE-Connectivity-datasheet-181572785.pdf?src-supplier=Sager+Electronics, Composition="Thick Film", Device Class L1="Passive Components", Device Class L2=Resistors, Device Class L3="Chip SMD Resistors", Digikey Description="RES SMD 4.7 OHM 1% 1/4W 0805", Footprint Url=http://www.yageo.com/exep/pages/download/literatures/PYu-R_Mount_10.pdf, Height=0.6mm, Ipc Land Pattern Name=RESC200125X50, Lead Free=Yes, Length=2mm, Lifecycle Status=Production, Mounting Technology="Surface Mount", Number of Terminals=2, Octopart=https://octopart.com/sr0805fr-7w4r7l-yageo-71414350, REACH SVHC=Yes, RoHS=TRUE, Series=SR, Stock=3515, Supplier=Farnell, Supplier Part Number=RQ73C2A75KBTD, Temperature Range Low=-55°C, Width=1.25mm, Working Voltage=100V
R36 R61: library part ERA-3VEB6341V, "Fixed Resistor, Thin Film, 0.125W, 6340ohm, 100V, 0.1% +/-Tol, 25ppm/Cel, Surface Mount, 0603", Arrow Part Number=SR0603FR-7T10KL, Case/Package=0603, Manufacturer="Yageo Group", Manufacturer Lifecycle Status=ACTIVE, Max Operating Temperature=155°C, Max Voltage Rating (DC)=100V, Min Operating Temperature=-55°C, Mouser Part Number=603-SR0603FR-7T10KL, Power Rating=250mW, Ratings=AEC-Q200, Supplier Part Number=YAG5823CT-ND, Temperature Coefficient=100ppm/°C, Tolerance=1%, Voltage Rating=75V, Working Voltage=150V, Arrow Price/Stock=https://www.arrow.com/en/products/sr0603fr-7t10kl/yageo, Category="Chip SMD Resistors", China RoHS=Non-Compliant, ComponentLink1Description=https://datasheet.octopart.com:443/SR0603FR-7T10KL-Yageo-datasheet-176402240.pdf?src-supplier=Farnell, ComponentLink1URL=https://datasheet.octopart.com:443/SR0603FR-7T10KL-Yageo-datasheet-176402240.pdf?src-supplier=Farnell, ComponentLink2Description=https://datasheet.octopart.com:443/SR0603FR-7T10KL-Yageo-datasheet-119732217.pdf?src-supplier=Upverter, ComponentLink2URL=https://datasheet.octopart.com:443/SR0603FR-7T10KL-Yageo-datasheet-119732217.pdf?src-supplier=Upverter, ComponentLink3Description=https://datasheet.octopart.com:443/SR0603FR-7T10KL-Yageo-Group-datasheet-184785656.pdf?src-supplier=Future+Electronics, ComponentLink3URL=https://datasheet.octopart.com:443/SR0603FR-7T10KL-Yageo-Group-datasheet-184785656.pdf?src-supplier=Future+Electronics, ComponentLink4Description=https://datasheet.octopart.com:443/SR0603FR-7T10KL-Yageo-datasheet-155675517.pdf?src-supplier=Future+Electronics, ComponentLink4URL=https://datasheet.octopart.com:443/SR0603FR-7T10KL-Yageo-datasheet-155675517.pdf?src-supplier=Future+Electronics, ComponentLink5Description=https://datasheet.octopart.com:443/SR0603FR-7T10KL-Yageo-datasheet-137701088.pdf?src-supplier=Future+Electronics, ComponentLink5URL=https://datasheet.octopart.com:443/SR0603FR-7T10KL-Yageo-datasheet-137701088.pdf?src-supplier=Future+Electronics, ComponentLink6Description=https://datasheet.octopart.com/SR0603FR-7T10KL-Yageo-datasheet-11047080.pdf, ComponentLink6URL=https://datasheet.octopart.com/SR0603FR-7T10KL-Yageo-datasheet-11047080.pdf, ComponentLink7Description=http://sigma.octopart.com:80/conflict_mineral_statement/Yageo-company-3.pdf?src-supplier=Compliance+Statements, ComponentLink7URL=http://sigma.octopart.com:80/conflict_mineral_statement/Yageo-company-3.pdf?src-supplier=Compliance+Statements, ComponentLink8Description=http://sigma.octopart.com:80/rohs_statement/Yageo-company-2.pdf?src-supplier=Compliance+Statements, ComponentLink8URL=http://sigma.octopart.com:80/rohs_statement/Yageo-company-2.pdf?src-supplier=Compliance+Statements, ComponentLink9Description=https://datasheet.octopart.com:443/SR0603FR-7T4R7L-Yageo-datasheet-176402240.pdf?src-supplier=Farnell, ComponentLink9URL=https://datasheet.octopart.com:443/SR0603FR-7T4R7L-Yageo-datasheet-176402240.pdf?src-supplier=Farnell, ComponentLink10Description=https://datasheet.octopart.com:443/SR0603FR-7T4R7L-Yageo-datasheet-119732217.pdf?src-supplier=Upverter, ComponentLink10URL=https://datasheet.octopart.com:443/SR0603FR-7T4R7L-Yageo-datasheet-119732217.pdf?src-supplier=Upverter, ComponentLink11Description=https://datasheet.octopart.com:443/SR0603FR-7T4R7L-Yageo-Group-datasheet-184785656.pdf?src-supplier=Future+Electronics, ComponentLink11URL=https://datasheet.octopart.com:443/SR0603FR-7T4R7L-Yageo-Group-datasheet-184785656.pdf?src-supplier=Future+Electronics, ComponentLink12Description=https://datasheet.octopart.com:443/SR0603FR-7T4R7L-Yageo-datasheet-155675517.pdf?src-supplier=Future+Electronics, ComponentLink12URL=https://datasheet.octopart.com:443/SR0603FR-7T4R7L-Yageo-datasheet-155675517.pdf?src-supplier=Future+Electronics, ComponentLink13Description=https://datasheet.octopart.com:443/SR0603FR-7T4R7L-Yageo-datasheet-137701088.pdf?src-supplier=Future+Electronics, ComponentLink13URL=https://datasheet.octopart.com:443/SR0603FR-7T4R7L-Yageo-datasheet-137701088.pdf?src-supplier=Future+Electronics, ComponentLink14Description=https://datasheet.octopart.com/SR0603FR-7T4R7L-Yageo-datasheet-11047080.pdf, ComponentLink14URL=https://datasheet.octopart.com/SR0603FR-7T4R7L-Yageo-datasheet-11047080.pdf, ComponentLink15Description=https://datasheet.octopart.com:443/SR0603FR-7T100KL-Yageo-datasheet-176402240.pdf?src-supplier=element14+APAC, ComponentLink15URL=https://datasheet.octopart.com:443/SR0603FR-7T100KL-Yageo-datasheet-176402240.pdf?src-supplier=element14+APAC, ComponentLink16Description=https://datasheet.octopart.com:443/SR0603FR-7T100KL-Yageo-datasheet-119732217.pdf?src-supplier=Upverter, ComponentLink16URL=https://datasheet.octopart.com:443/SR0603FR-7T100KL-Yageo-datasheet-119732217.pdf?src-supplier=Upverter, ComponentLink17Description=https://datasheet.octopart.com:443/SR0603FR-7T100KL-Yageo-Group-datasheet-184785656.pdf?src-supplier=Future+Electronics, ComponentLink17URL=https://datasheet.octopart.com:443/SR0603FR-7T100KL-Yageo-Group-datasheet-184785656.pdf?src-supplier=Future+Electronics, ComponentLink18Description=https://datasheet.octopart.com:443/SR0603FR-7T100KL-Yageo-datasheet-155675517.pdf?src-supplier=Future+Electronics, ComponentLink18URL=https://datasheet.octopart.com:443/SR0603FR-7T100KL-Yageo-datasheet-155675517.pdf?src-supplier=Future+Electronics, ComponentLink19Description=https://datasheet.octopart.com:443/SR0603FR-7T100KL-Yageo-datasheet-137701088.pdf?src-supplier=Future+Electronics, ComponentLink19URL=https://datasheet.octopart.com:443/SR0603FR-7T100KL-Yageo-datasheet-137701088.pdf?src-supplier=Future+Electronics, ComponentLink20Description=https://datasheet.octopart.com/SR0603FR-7T100KL-Yageo-datasheet-11047080.pdf, ComponentLink20URL=https://datasheet.octopart.com/SR0603FR-7T100KL-Yageo-datasheet-11047080.pdf, ComponentLink21Description=https://datasheet.octopart.com:443/RS73F1JTTD2001B-KOA-Speer-datasheet-182143723.pdf?src-supplier=IHS, ComponentLink21URL=https://datasheet.octopart.com:443/RS73F1JTTD2001B-KOA-Speer-datasheet-182143723.pdf?src-supplier=IHS, ComponentLink22Description=https://datasheet.octopart.com:443/RS73F1JTTD2001B-KOA-Speer-datasheet-141350738.pdf?src-supplier=KOA+Speer+SCT, ComponentLink22URL=https://datasheet.octopart.com:443/RS73F1JTTD2001B-KOA-Speer-datasheet-141350738.pdf?src-supplier=KOA+Speer+SCT, ComponentLink23Description=https://sigma.octopart.com:443/141350679/technical_drawing/KOA-Speer-RS73F1JTTD2001B.pdf?src-supplier=KOA+Speer+SCT, ComponentLink23URL=https://sigma.octopart.com:443/141350679/technical_drawing/KOA-Speer-RS73F1JTTD2001B.pdf?src-supplier=KOA+Speer+SCT, ComponentLink24Description=http://sigma.octopart.com:80/rohs_statement/KOA-Speer-company-17.pdf?src-supplier=Compliance+Statements, ComponentLink24URL=http://sigma.octopart.com:80/rohs_statement/KOA-Speer-company-17.pdf?src-supplier=Compliance+Statements, ComponentLink25Description=https://datasheet.octopart.com:443/ERA3VEB6341V-Panasonic-datasheet-150570798.pdf?src-supplier=Panasonic, ComponentLink25URL=https://datasheet.octopart.com:443/ERA3VEB6341V-Panasonic-datasheet-150570798.pdf?src-supplier=Panasonic, ComponentLink26Description=https://sigma.octopart.com:443/150570796/technical_drawing/Panasonic-ERA3VEB6341V.pdf?src-supplier=Panasonic+SCT, ComponentLink26URL=https://sigma.octopart.com:443/150570796/technical_drawing/Panasonic-ERA3VEB6341V.pdf?src-supplier=Panasonic+SCT, Composition="Thick Film", Country of Origin="Mainland China, Taiwan", Datasheet Link=https://mouser.componentsearchengine.com/Datasheets/1/SR0603FR-7T10KL.pdf, Export Control Classification Number (ECCN) Code=EAR99, Harmonized Tariff Schedule (HTS) Code=8533.21.00.30, Height=0.55mm, Introduction Date=2017-10-02, Length=1.6mm, Lifecycle Status=Production, Manufacturer Part Number=SR0603FR-7T10KL, Manufacturer_Name="Yageo Group", Manufacturer_Part_Number=SR0603FR-7T10KL, Mounting Technology="Surface Mount", Mouser Price/Stock=https://www.mouser.co.uk/ProductDetail/YAGEO/SR0603FR-7T10KL?qs=pfd5qewlna6IurLw3u3uRA%3D%3D, Number of Terminals=2, Packaging="Tape & Reel", Part Series="Thin Film Chip Resistors, High Stability and Reliability Type", Pricing="1=0,67, 10=0,399, 25=0,3376, 50=0,3022, 100=0,2744, 250=0,24612, 500=0,22976, 1000=0,21675 (USD)", REACH SVHC=Yes, RoHS=Compliant, Schedule B="8533210045, 8533210045|8533210045|8533210045|8533210045|8533210045", Stock=5000, Supplier=DigiKey, Width=800µm